# Allegro board T736_DEMO_DBOARD_V2_0.brd
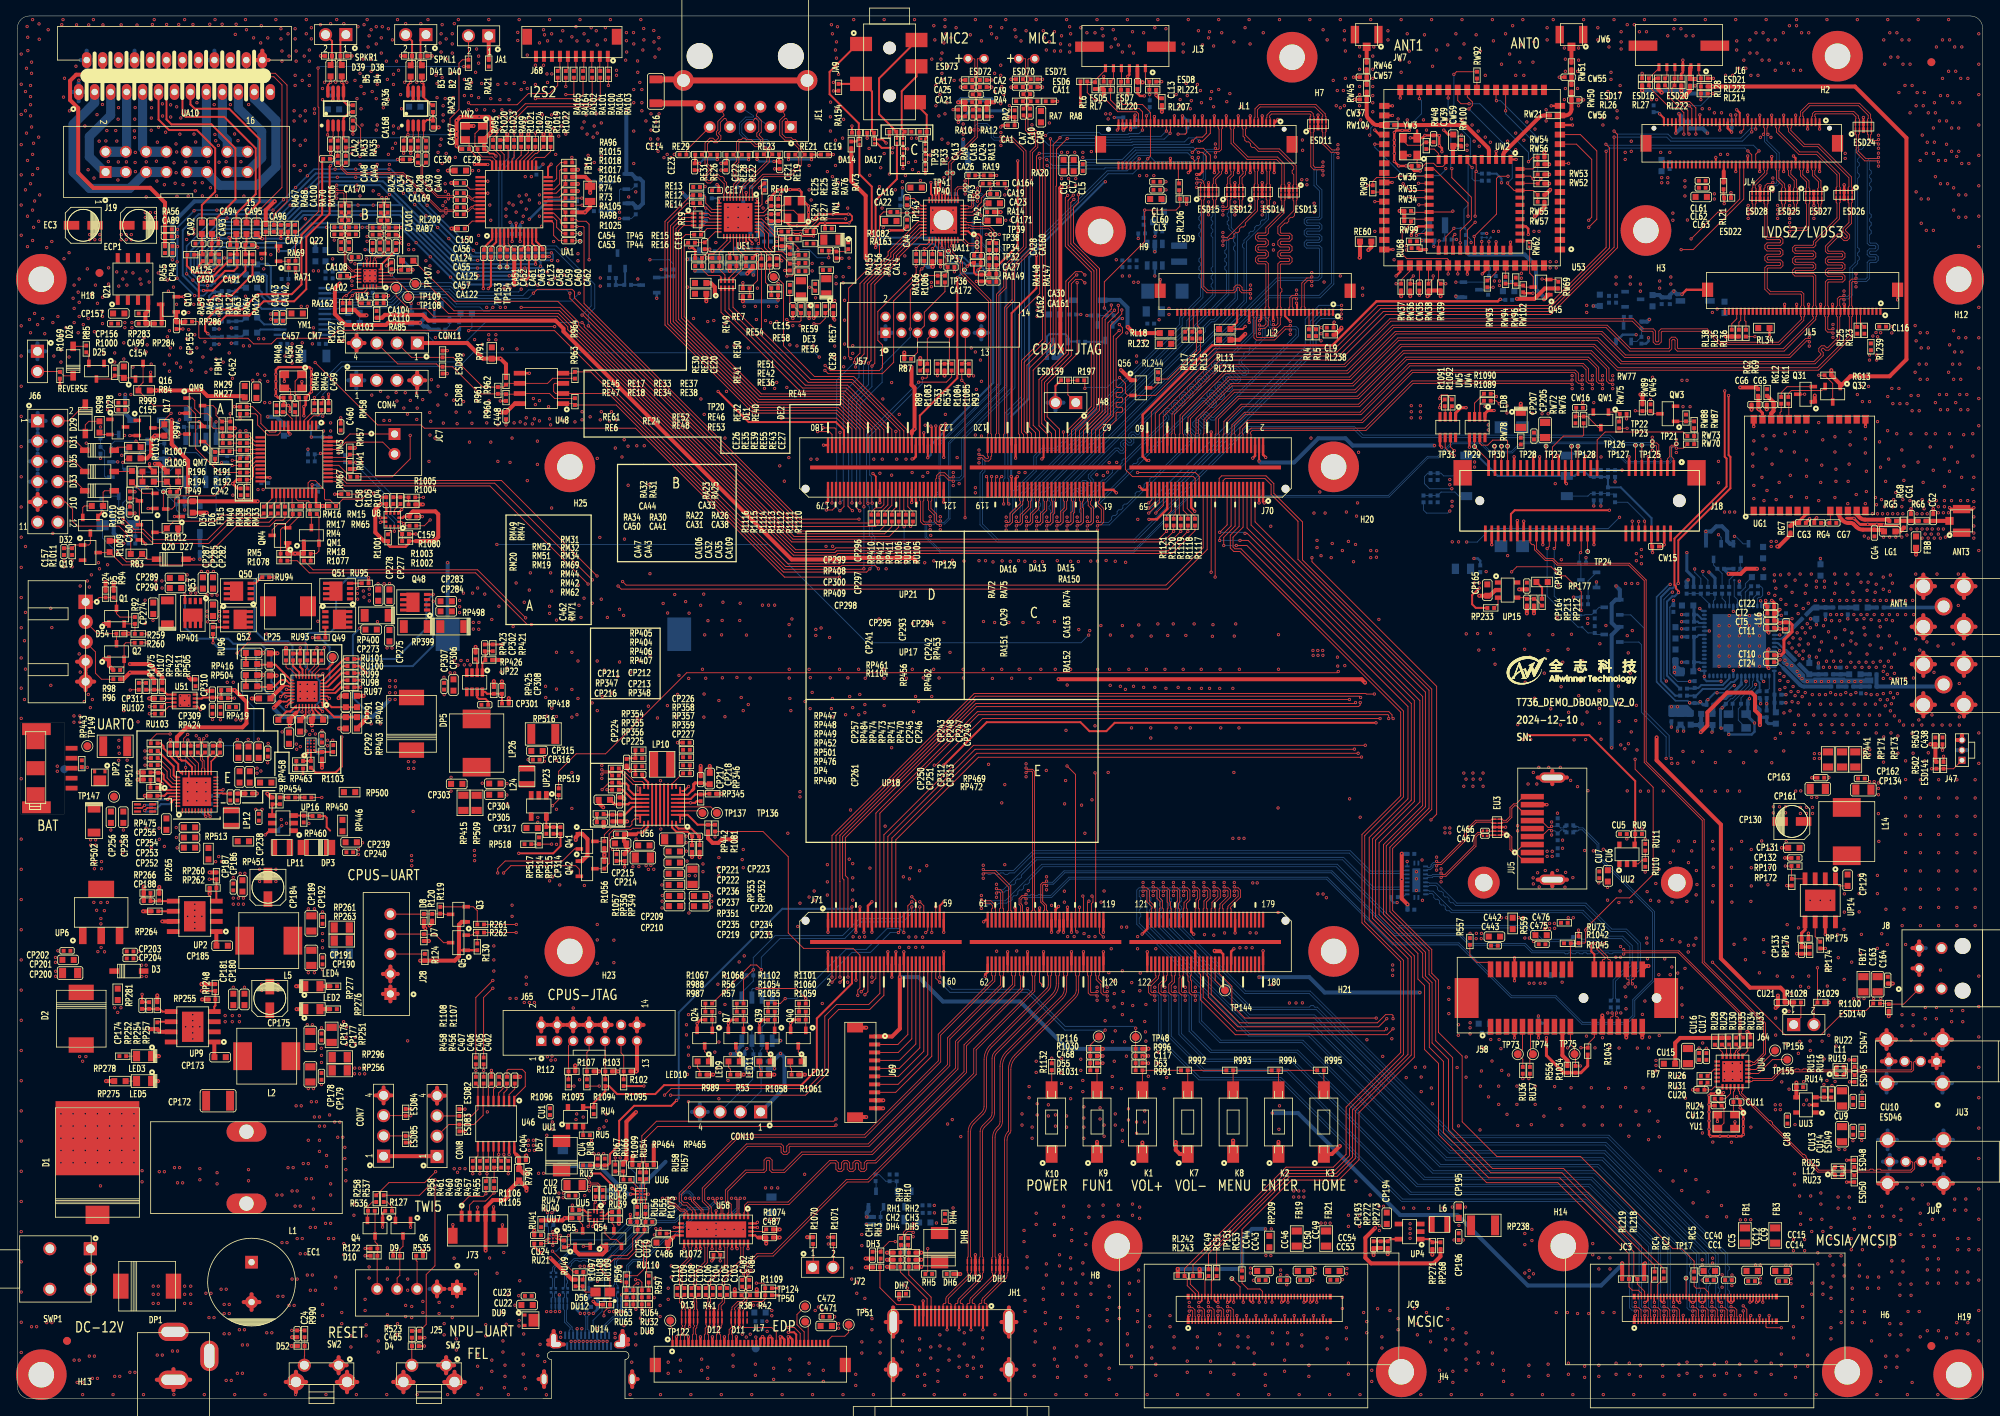
[diagram p0: board, top side]
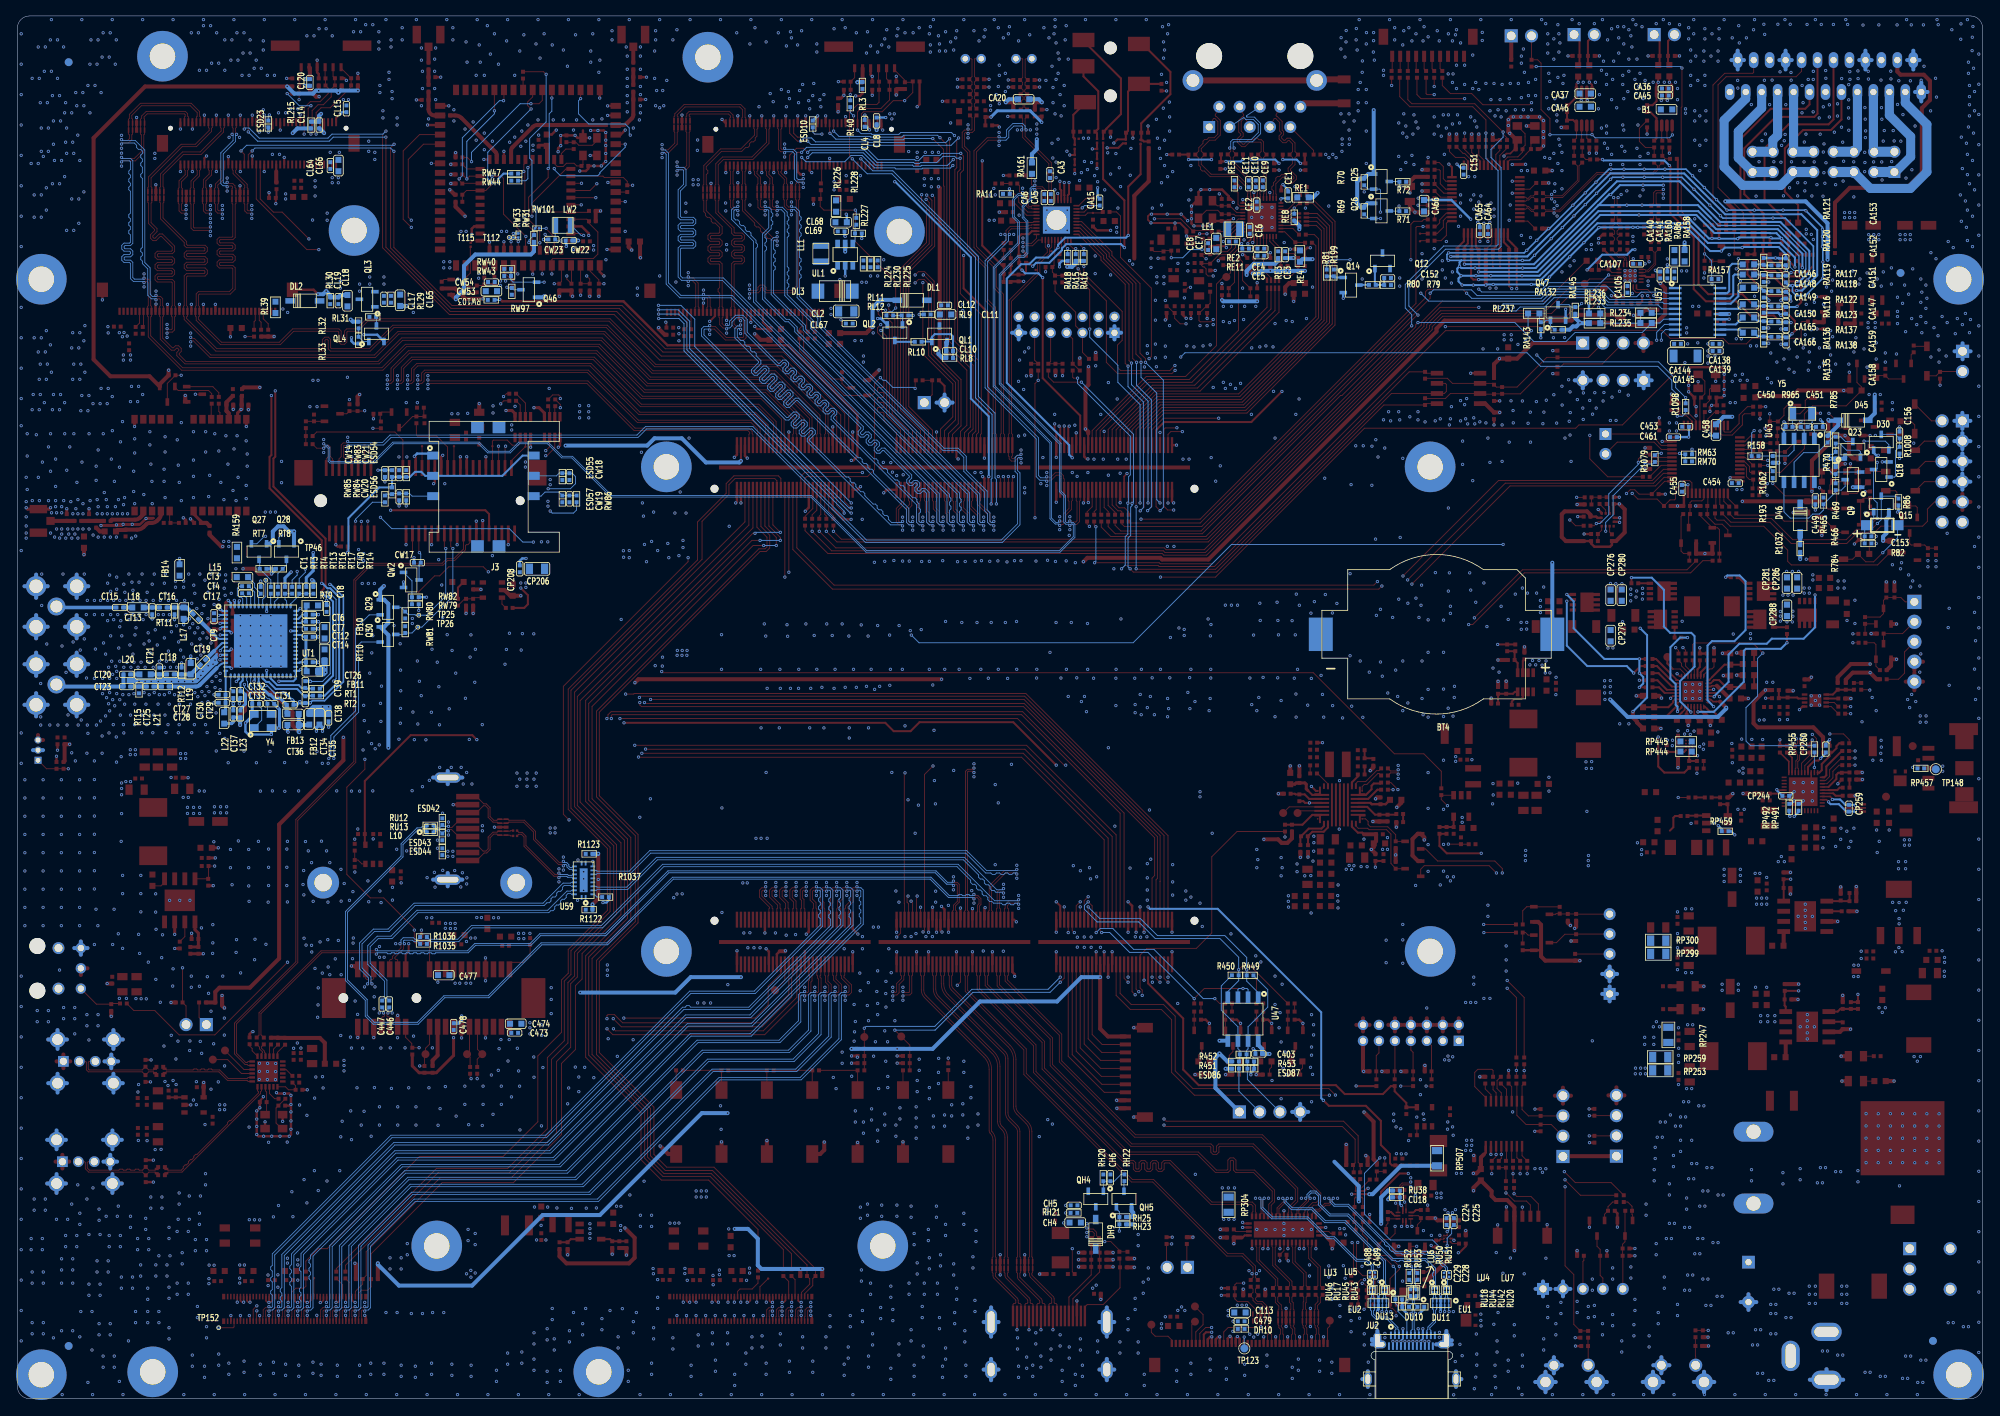
[diagram p1: board, bottom side, seen from below]

Outline 246.2 x 173.3 mm; copper layers: TOP, L2GND, L3, L4, L5GND, BOTTOM. Coordinates in mm from the lower left corner of the outline.
Outline path: 0,171.78 0,1.52 arc(0.45,0.45) 1.52,0 66.88,0 66.88,4.9 arc(66.38,5.4) 66.88,5.9 76.12,5.9 arc(76.62,5.4) 76.12,4.9 76.12,0 244.68,0 arc(245.75,0.45) 246.2,1.52 246.2,171.78 arc(245.75,172.86) 244.68,173.3 1.52,173.3 arc(0.45,172.86) 0,171.78

## Design rules (mm)
net group COMB0-LANE0-N: nets DP-TX0P-1 EDP-TX0P
net group COMB0-LANE0-P: nets DP-TX0N-1 EDP-TX0N
net group COMB0-LANE1-N: nets DP-TX1N-1 EDP-TX1N
net group COMB0-LANE1-P: nets DP-TX1P-1 EDP-TX1P
net group COMB0-LANE2-N: nets DP-TX2P-1 EDP-TX2P
net group COMB0-LANE2-P: nets DP-TX2N-1 EDP-TX2N
net group COMB0-LANE3-N: nets DP-TX3N-1 EDP-TX3N
net group COMB0-LANE3-P: nets DP-TX3P-1 EDP-TX3P
net group DP1: nets MICIN1N-MIC MICIN1P-MIC
net group DP2: nets MICIN2N-MIC MICIN2P-MIC
net group DP3: nets MICIN2N-AC107 MICIN2P-AC107
net group DP-AUXN-1: nets DP-AUXN-1 DP-AUXN-C
net group DP-AUXP-1: nets DP-AUXP-1 DP-AUXP-C
net group HCP: nets HCEC HHPD
net group HS: nets HSCL HSDA
net group HTX0: nets HTX0N HTX0P
net group HTX1: nets HTX1N HTX1P
net group HTX2: nets HTX2N HTX2P
net group HTXC: nets HTXCN HTXCP
net group HUB1: nets HUB-DM1 HUB-DP1
net group HUB-DM3: nets HUB-DM3 N23169507
net group HUB-DM4: nets HUB-DM4 N23169528
net group HUB-DP3: nets HUB-DP3 N23169508
net group HUB-DP4: nets HUB-DP4 N23169529
net group HUB-IN-DM: nets HUB-IN-DM USB1-DM
net group HUB-IN-DP: nets HUB-IN-DP USB1-DP
net group LINEOUT-DSP-L: nets LINEOUT-DSP-LN LINEOUT-DSP-LP
net group LINEOUT-DSP-R: nets LINEOUT-DSP-RN LINEOUT-DSP-RP
net group LINEOUTL: nets LINEOUTLN LINEOUTLP
net group LINEOUTR: nets LINEOUTRN LINEOUTRP
net group LVDS1-D3: nets LVDS1-D3N LVDS1-D3P
net group MCSIA-CK: nets MCSIA-CKN MCSIA-CKP
net group MCSIA-D0: nets MCSIA-D0N MCSIA-D0P
net group MCSIA-D1: nets MCSIA-D1N MCSIA-D1P
net group MCSIA-D2: nets MCSIA-D2N MCSIA-D2P
net group MCSIA-D3: nets MCSIA-D3N MCSIA-D3P
net group MCSIB-CK: nets MCSIB-CKN MCSIB-CKP
net group MCSIB-D0: nets MCSIB-D0N MCSIB-D0P
net group MCSIB-D1: nets MCSIB-D1N MCSIB-D1P
net group MCSIB-D2: nets MCSIB-D2N MCSIB-D2P
net group MCSIB-D3: nets MCSIB-D3N MCSIB-D3P
net group MCSIC-CK: nets MCSIC-CKN MCSIC-CKP
net group MCSIC-D0: nets MCSIC-D0N MCSIC-D0P
net group MCSIC-D1: nets MCSIC-D1N MCSIC-D1P
net group MCSIC-D2: nets MCSIC-D2N MCSIC-D2P
net group MCSIC-D3: nets MCSIC-D3N MCSIC-D3P
net group MDI0: nets MDI0+ MDI0-
net group MDI1: nets MDI1+ MDI1-
net group MDI2: nets MDI2+ MDI2-
net group MDI3: nets MDI3+ MDI3-
net group MICIN1: nets MICIN1N MICIN1P
net group MICIN1-1: nets MICIN1N-AC107 MICIN1P-AC107
net group MICIN2: nets MICIN2N MICIN2P
net group MICIN3: nets MICIN3N MICIN3P
net group MICIN4: nets MICIN4N MICIN4P
net group PCIE21-RD: nets PCIE21-RDN PCIE21-RDP
net group PCIE21-REFCLKN: nets N19487540 PCIE21-REFCLKN
net group PCIE21-REFCLKP: nets N19487538 PCIE21-REFCLKP
net group PCIE21-TDN: nets N21159878 PCIE21-TDN
net group PCIE21-TDP: nets N21159841 PCIE21-TDP
net group RX-1N: nets COMB0-LANE1-N-C RX-1N
net group RX-1P: nets COMB0-LANE1-P-C RX-1P
net group RX-2N: nets COMB0-LANE2-N-C RX-2N
net group RX-2P: nets COMB0-LANE2-P-C RX-2P
net group SPK+-1: nets N19462549 N19462627
net group SPK--1: nets N19462537 N19462788
net group SPKL: nets SPKL+ SPKL-
net group SPKR: nets SPKR+ SPKR-
net group U3-PCIE21-RX: nets U3-PCIE21-RXN U3-PCIE21-RXP
net group U3-PCIE21-TX: nets U3-PCIE21-TXN U3-PCIE21-TXP
net group USB2-DM: nets N17311481 USB2-DM
net group USB2-DP: nets N17311494 USB2-DP
net group USB3-RX: nets USB3-RXN USB3-RXP
net group USB3-TXN-1: nets USB3-TXN USB3-TXN-1
net group USB3-TXP-1: nets USB3-TXP USB3-TXP-1
net group 3V3-STBY: nets EXT-3V3
net group ANT0: nets ANT0 N23955323 N23955325
net group ANT1: nets ANT1 N23955200 N23955219
net group AOUT: nets AOUT1 AOUT2 AOUT3 AOUT3L AOUT3R AOUT4 AOUT5 AOUT6 AOUT_1 AOUT_2 AOUT_3 AOUT_4 AOUT_5 AOUT_6 N23523036 N23523040 N23523124 N23523128
net group COMB0-LANE0-N-C-1: nets COMB0-LANE0-N-C COMB0-LANE0-N-C-1 TX-1N
net group COMB0-LANE0-P-C-1: nets COMB0-LANE0-P-C COMB0-LANE0-P-C-1 TX-1P
net group COMB0-LANE3-N-C-1: nets COMB0-LANE3-N-C COMB0-LANE3-N-C-1 TX-2N
net group COMB0-LANE3-P-C-1: nets COMB0-LANE3-P-C COMB0-LANE3-P-C-1 TX-2P
net group NCSI_D: nets 4G-I2S-BCLK 4G-I2S-DIN 4G-I2S-DOUT 4G-I2S-LRCK I2S2-BCLK I2S2-DOUT0 I2S2-DOUT1 I2S2-LRCK N20492590 N20492593 N20492596 N20492599 N23264918 N23264955 N23264967 N23264991 PCMCLK PCMDI PCMDOUT PCMSYNC
net group POWER-10MIL: nets AXP515-PWROK N22132221 N22132227 N22132299 N22446567 RTCLDO-BMU-ONBOARD
net group PWR: nets PANEL0-12V USB1-DRVVBUS VCC VCC-3V3-GPHY VCC-232-3V3 VCC-485-3V3 VCC-CTP0 VCC-CTP1 VCC-PI VCC-PK VCC-PL VCC-PM VCC-RTC VDRV
net group RGMII_R: nets DVDDRG RGMII0-RXCK RGMII0-RXCTL RGMII0-RXD3 RXC/PHYAD1 RXCTL/PHYAD2 RXD3/PHYAD0
net group RGMII_T: nets RGMII0-TXCK RGMII0-TXCTL RGMII0-TXD0 RGMII0-TXD1 RGMII0-TXD2 RGMII0-TXD3 TXC TXCTL TXD0 TXD1 TXD2 TXD3
net group TYPE-C-D+: nets N21619013 N22132297 TYPE-C-D+ TYPEC-DM TYPEC-DM-1 USB0-DM
net group TYPE-C-D-: nets N21619068 N22132296 TYPE-C-D- TYPEC-DP TYPEC-DP-1 USB0-DP
net group WIFI-5MIL: nets GND_ADC N24228229 N24228241 N24228256 N24228355 N24228385 N24228387 N24228483 N24228516 N24228560 N24228562 N24228564 N24228625 N24228645
nets with their own width: min track width 0.102; nets GND
nets with their own width: min track width 0.114; nets LD2

## Placement (name value [footprint] x y rotation side)
ANT3  GPS-ANT  [ANT3B300_310H125]  243.57 110.02 90 top
ANT4  Antenna_SW4_SMD  [SMA5B700_1500H986]  245.31 99.29 270 top
ANT5  Antenna_SW4_SMD  [SMA5B700_1500H986]  245.31 89.51 270 top
B1  600R-100M  [L0603]  39.6 161.59 0 bottom
B2  600R-100M  [L0603]  50.67 166.42 90 top
B3  600R-100M  [L0603]  49.28 166.42 90 top
B4  600R-100M  [L0603]  40.64 166.44 90 top
B5  600R-100M  [L0603]  39.24 166.44 90 top
BT4  CR2032-8  [CR2B2000_2850H550]  68.41 95.81 180 bottom
C24  1nF  [C0402]  35.05 8.13 270 top
C103  100nF  [C0402]  88.9 13.44 270 top
C104  100nF  [C0402]  87.12 13.44 270 top
C105  100nF  [C0402]  88.01 13.44 270 top
C106  100nF  [C0402]  86.23 13.44 270 top
C107  100nF  [C0402]  85.34 13.44 270 top
C108  100nF  [C0402]  84.45 13.44 270 top
C109  100nF  [C0402]  83.57 13.44 270 top
C110  100nF  [C0402]  82.68 13.44 270 top
C113  4.7uF  [C0603]  93.04 10.8 0 bottom
C117  1nF  [C0402]  140.52 42.95 180 top
C150  10uF  [C0603]  55.5 153.92 180 top
C151  100nF  [C0402]  65.02 153.85 90 bottom
C152  1uF  [C0402]  74.55 140.46 180 bottom
C153  NC-100nF  [C0402]  14.35 108.08 180 bottom
C154  100nF-50V  [C0603]  13.34 128.65 270 top
C155  100nF-50V  [C0402]  13.08 123.95 0 top
C156  NC-100nF-25V  [C0402]  10.41 120.78 270 bottom
C157  NC-100nF-25V  [C0402]  5.84 106.17 90 top
C158  100nF  [C0402]  46.21 112.57 270 top
C159  100nF  [C0402]  49.56 110.55 180 top
C160  NC-100nF-25V  [C0402]  14.1 111.38 90 top
C163  10uF-50V  [C0805]  233.04 51.94 270 top
C164  100nF  [C0402]  234.31 52.45 270 top
C224  100nF  [C0402]  67.16 22.2 270 bottom
C225  100nF  [C0402]  66.24 22.2 270 bottom
C228  100nF  [C0201]  67.49 15.52 270 bottom
C229  100nF  [C0201]  66.83 15.52 270 bottom
C242  NC-1nF-50V  [C0402]  19.56 113.67 0 top
C402  0.1uF  [C0402]  62.31 39.92 90 top
C403  0.1uF  [C0402]  90.68 43.21 0 bottom
C404  0.22uF  [C0402]  63.28 29.89 180 top
C405  0.1uF  [C0402]  61.34 39.92 90 top
C406  0.1uF  [C0402]  60.36 39.92 90 top
C407  0.1uF  [C0402]  59.39 39.92 270 top
C438  100nF  [C0402]  241.17 82.45 90 top
C442  10uF-50V  [C0603]  185.04 57.91 180 top
C443  1uF-50V  [C0402]  185.04 56.77 180 top
C446  100nF  [C0402]  199.61 49.47 270 bottom
C447  100nF  [C0402]  200.5 49.47 270 bottom
C448  NC/224  [C0402]  61.21 123.19 270 top
C449  100nF  [C0402]  20.95 112.52 90 bottom
C450  18pF  [C0402]  24.26 121.79 0 bottom
C451  18pF  [C0402]  20.45 121.79 180 bottom
C452  4.7uF  [C0603]  29.95 126.14 90 top
C453  100nF  [C0402]  37.21 121.82 180 bottom
C454  100nF  [C0402]  30.99 114.76 0 bottom
C455  100nF  [C0402]  37.67 114.1 90 bottom
C456  1uF  [C0402]  33.27 124.08 90 top
C457  20pF  [C0402]  33.78 125.48 0 top
C458  4.7uF  [C0603]  33.4 121.41 90 bottom
C459  100nF  [C0402]  38.99 124.33 270 top
C460  100nF  [C0402]  40.51 121.79 270 top
C461  1uF  [C0402]  38.73 120.52 0 bottom
C462  100nF  [C0402]  27.98 113.67 270 top
C465  1nF  [C0402]  50.39 8.06 270 top
C466  100nF  [C0201]  183.85 71.2 0 top
C467  100nF  [C0201]  183.85 70.54 0 top
C468  1nF  [C0402]  134.83 42.95 180 top
C471  10uF-16V  [C0603]  101.33 9.11 0 top
C472  1uF-16V  [C0402]  101.33 10.27 0 top
C473  1uF  [C0402]  183.9 45.85 180 bottom
C474  10uF-16V  [C0603]  183.77 46.99 180 bottom
C475  100nF  [C0402]  191.01 56.95 180 top
C476  4.7uF  [C0603]  190.88 58.09 180 top
C477  4.7uF  [C0603]  192.79 53.09 180 bottom
C478  100nF  [C0402]  191.54 46.63 90 bottom
C479  100nF  [C0402]  92.89 9.69 180 bottom
C482  100nF  [C0402]  90.81 14.45 270 top
C484  100nF  [C0402]  91.69 14.45 270 top
C486  4.7uF  [C0603]  80.77 19.56 180 top
C487  100nF  [C0402]  94.23 20.19 180 top
C488  100nF  [C0201]  76.78 15.54 270 bottom
C489  100nF  [C0201]  76.12 15.54 270 bottom
CA1  1uF  [C0402]  124.51 159.59 0 top
CA2  33pF  [C0402]  125.54 164.39 180 top
CA3  1uF  [C0402]  116.84 153.42 270 bottom
CA4  100nF  [C0402]  111.46 147.35 270 top
CA5  4.7uF  [C0402]  116.74 150.55 90 bottom
CA6  100nF  [C0402]  117.55 150.55 90 bottom
CA7  100nF  [C0402]  126.04 161.26 90 top
CA8  10uF  [C0603]  128.23 160.68 270 top
CA9  100pF  [C0402]  126.45 163.5 180 top
CA10  100nF  [C0402]  126.87 161.26 90 top
CA11  33pF  [C0402]  127.37 164.39 180 top
CA13  1uF  [C0402]  117.88 161.14 270 top
CA14  2.2uF  [C0402]  115.65 143.03 90 top
CA15  2.2uF  [C0402]  110.62 149.96 90 bottom
CA16  10uF  [C0603]  112.6 151.79 180 top
CA17  33pF  [C0402]  119.2 164.39 180 top
CA18  100nF  [C0402]  119.7 161.14 90 top
CA19  0.47uF  [C0402]  122.3 151 180 top
CA20  10uF  [C0603]  120.14 162.86 180 bottom
CA21  100pF  [C0402]  120.1 163.47 180 top
CA22  2.2uF  [C0402]  111.46 150.01 90 top
CA23  4.7uF  [C0603]  122.38 149.83 180 top
CA24  100nF  [C0402]  120.51 161.14 90 top
CA25  33pF  [C0402]  121 164.39 180 top
CA26  NC  [C0402]  119.58 153.31 180 top
CA27  2.2uF  [C0402]  120.27 143.26 180 top
CA28  100nF/1uF  [C0402]  121.75 144.41 270 top
CA29  100nF  [C0201]  110.95 156.39 270 top
CA30  33pF  [C0402]  122.21 140.98 0 top
CA31  22nF  [C0402]  44.93 145.9 0 top
CA32  470nF  [C0402]  45.44 144.48 270 top
CA33  NC  [C0402]  45.95 147.68 180 top
CA34  0.22uF  [C0402]  49.28 157.25 270 top
CA35  470nF  [C0402]  46.46 144.48 270 top
CA36  1uF  [C0402]  39.75 164.21 180 bottom
CA37  22uF  [C0603]  49.78 163.58 180 bottom
CA38  22nF  [C0402]  46.96 145.9 0 top
CA39  100nF  [C0402]  50.16 155.34 270 top
CA40  100nF  [C0402]  51.18 155.34 270 top
CA41  22nF  [C0402]  41.99 145.92 180 top
CA42  0.22uF  [C0402]  39.24 157.25 270 top
CA43  470nF  [C0402]  41.56 144.53 270 top
CA44  NC  [C0402]  41.06 147.7 0 top
CA45  1uF  [C0402]  39.75 163.32 180 bottom
CA46  22uF  [C0603]  49.78 161.93 180 bottom
CA47  470nF  [C0402]  40.56 144.53 270 top
CA48  100nF  [C0402]  40.13 155.34 270 top
CA49  100nF  [C0402]  41.15 155.34 270 top
CA50  22nF  [C0402]  40.13 145.92 180 top
CA51  2.2uF  [C0402]  58.44 143.56 90 top
CA52  2.2uF  [C0402]  59.33 143.57 90 top
CA53  2.2uF  [C0402]  69.09 145.14 180 top
CA54  2.2uF  [C0402]  69.09 146.02 180 top
CA55  100nF  [C0402]  55.5 150.22 0 top
CA56  2.2uF  [C0402]  55.5 152.37 180 top
CA57  100nF  [C0402]  55.5 148.44 0 top
CA58  1uF  [C0402]  63.14 143.6 270 top
CA59  1uF  [C0402]  64.02 143.6 270 top
CA60  1uF  [C0402]  64.91 143.61 270 top
CA61  2.2uF  [C0402]  60.47 143.58 90 top
CA62  1uF  [C0402]  65.8 143.62 270 top
CA63  2.2uF  [C0402]  61.36 143.58 90 top
CA64  100nF  [C0402]  61.98 146.41 270 bottom
CA65  1uF-16V  [C0402]  62.99 146.41 270 bottom
CA66  10uF-16V  [C0603]  69.98 149.53 90 bottom
CA89  1uF  [C0402]  18.92 145.67 0 top
CA90  1nF  [C0402]  22.73 144.78 0 top
CA91  1nF  [C0402]  24.77 144.78 180 top
CA92  1uF  [C0603]  23.11 146.69 90 top
CA93  1uF  [C0603]  24.38 146.69 90 top
CA94  1uF  [C0603]  27.43 146.69 90 top
CA95  1uF  [C0603]  28.7 146.69 90 top
CA96  4.7uF  [C0603]  29.97 146.69 90 top
CA97  1nF  [C0402]  28.98 144.6 180 top
CA98  1nF  [C0402]  27.08 144.6 0 top
CA99  1uF-50V  [C0402]  15.62 134.75 0 top
CA100  1uF  [C0402]  33.02 146.69 270 top
CA101  100nF  [C0402]  46.86 141.99 90 top
CA102  1uF  [C0402]  40.87 140.74 180 top
CA103  100nF  [C0402]  43.58 137.28 180 top
CA104  100nF  [C0402]  45.47 138.18 0 top
CA105  1uF  [C0402]  44.5 139.04 90 bottom
CA106  1uF  [C0402]  44.5 144.42 90 top
CA107  100nF  [C0402]  43.36 142.24 0 bottom
CA108  1uF  [C0402]  42.31 143.09 180 top
CA109  1uF  [C0402]  47.45 144.42 90 top
CA110  1uF  [C0402]  45.46 137.29 0 top
CA122  1uF  [C0402]  55.63 146.66 180 top
CA123  2.2uF-16V  [C0402]  62.25 143.59 90 top
CA124  100nF  [C0402]  55.5 151.1 0 top
CA125  100nF  [C0402]  55.5 149.33 0 top
CA138  10uF  [C0402]  33.4 132.21 0 bottom
CA139  100nF  [C0402]  33.4 131.32 0 bottom
CA140  100nF  [C0402]  40.39 140.84 90 bottom
CA141  1uF  [C0402]  39.5 140.84 90 bottom
CA142  100nF  [C0402]  33.27 135.51 270 top
CA143  1uF  [C0402]  32.38 135.51 270 top
CA144  100nF  [C0402]  38.23 132.21 180 bottom
CA145  33uF  [C1206]  37.21 130.68 180 bottom
CA146  3.3uF  [C0603]  29.34 142.16 180 bottom
CA147  2.7nF  [C0402]  24.64 136.4 270 bottom
CA148  3.3uF  [C0603]  29.34 140.89 180 bottom
CA149  3.3uF  [C0603]  29.34 139.24 180 bottom
CA150  3.3uF  [C0603]  29.34 137.16 180 bottom
CA151  2.7nF  [C0402]  24.64 138.3 270 bottom
CA152  2.7nF  [C0402]  24.66 140.34 270 bottom
CA153  2.7nF  [C0402]  24.66 142.49 90 bottom
CA158  2.7nF  [C0402]  24.64 132.59 270 bottom
CA159  2.7nF  [C0402]  24.64 134.49 270 bottom
CA160  100nF/1uF  [C0402]  122.64 144.41 270 top
CA161  NC/33pF  [C0402]  122.21 139.97 180 top
CA162  NC/33pF  [C0402]  120.78 140.46 270 top
CA163  100nF  [C0201]  113.74 155.63 270 top
CA164  NC  [C0402]  121.36 152.3 180 top
CA165  3.3uF  [C0603]  29.34 135.51 180 bottom
CA166  3.3uF  [C0603]  29.34 133.6 180 bottom
CA167  NC/100nF  [C0402]  52.07 159.77 270 top
CA168  NC/100nF  [C0402]  42.04 159.77 270 top
CA169  NC/100nF  [C0402]  48.74 155.32 180 top
CA170  NC/100nF  [C0402]  38.73 155.4 180 top
CA171  2.2uF  [C0603]  122.26 147.65 180 top
CA172  100nF  [C0402]  116.97 141.83 0 top
CC1  100nF  [C0402]  212.09 14.86 0 top
CC5  100nF  [C0402]  214.36 14.86 180 top
CC9  100nF  [C0402]  217.25 14.73 180 top
CC12  10uF  [C0603]  217.33 16 180 top
CC14  100nF  [C0402]  221.11 14.73 180 top
CC15  10uF  [C0603]  220.93 16 180 top
CC40  10uF  [C0603]  211.96 16 0 top
CC43  100nF  [C0402]  155.96 14.86 0 top
CC44  10uF  [C0603]  156.04 16 0 top
CC46  100nF  [C0402]  158.62 14.86 180 top
CC49  100nF  [C0402]  161.12 14.86 180 top
CC50  10uF  [C0603]  161.12 16 180 top
CC53  100nF  [C0402]  164.91 14.88 180 top
CC54  10uF  [C0603]  164.93 16 180 top
CE1  100nF  [C0402]  87 150.88 270 bottom
CE2  100nF  [C0402]  90.93 149.61 90 bottom
CE3  100nF  [C0402]  87.38 143.38 90 bottom
CE4  100nF  [C0402]  90.42 144.15 0 bottom
CE5  100nF  [C0402]  90.42 143.26 0 bottom
CE6  NC-100nF  [C0402]  91.82 146.43 270 bottom
CE7  4.7uF  [C0603]  96.01 144.78 90 bottom
CE8  100nF  [C0402]  97.03 144.4 90 bottom
CE9  100nF  [C0402]  90.17 152.27 270 bottom
CE10  100nF  [C0402]  91.06 152.27 270 bottom
CE11  100nF  [C0402]  91.95 152.27 270 bottom
CE14  NC-100nF  [C0402]  83.39 155.93 180 top
CE15  NC-22PF  [C0402]  99.31 146.3 180 top
CE16  1nF-2KV  [C1206]  79.98 163.86 90 top
CE17  100nF  [C0402]  87.45 151.43 180 top
CE18  NC-22PF  [C0402]  86.11 144.5 270 top
CE19  NC-1nF  [C0402]  101.09 155.93 180 top
CE20  NC-22PF  [C0402]  95.12 142.49 270 top
CE21  NC-1nF  [C0402]  95.5 154.56 90 top
CE22  NC-1nF  [C0402]  88.77 154.41 90 top
CE23  NC-1nF  [C0402]  84.84 154.41 90 top
CE24  NC-20pF  [C0402]  94.44 148.03 90 top
CE25  NC-20pF  [C0402]  94.44 149.94 270 top
CE26  NC-100PF  [C0402]  97.16 136.5 90 top
CE27  NC-100PF  [C0402]  102.23 136.5 90 top
CE28  NC-100PF  [C0402]  102.62 143.36 90 top
CE29  20pF  [C0402]  58.07 156.59 180 top
CE30  20pF  [C0402]  56.16 156.62 0 top
CG1  NC  [C0402]  237.22 110.44 270 top
CG2  NC  [C0402]  240.01 110.44 270 top
CG3  100nF  [C0402]  223.63 109.76 180 top
CG4  10nF  [C0402]  232.65 108.49 90 top
CG5  100nF  [C0402]  219.58 124.59 0 top
CG6  100nF  [C0402]  217.68 124.59 0 top
CG7  100nF  [C0402]  227.44 109.76 0 top
CH1  100nF-16V  [C0402]  107.13 17.98 90 top
CH2  NC/pF  [C0402]  110.19 17.41 0 top
CH3  NC/pF  [C0402]  112.1 17.41 180 top
CH4  10uF-50V  [C0603]  113.68 22.07 180 bottom
CH5  100nF  [C0402]  113.82 24.23 180 bottom
CH6  1uF  [C0402]  109.27 27.67 90 bottom
CL1  100nF  [C0402]  142.75 152.53 180 top
CL2  1uF-50V  [C0805]  142.37 136.27 180 bottom
CL3  22uF  [C0603]  142.62 150.37 180 top
CL4  100nF  [C0402]  140.06 159.84 270 bottom
CL5  100nF-50V  [C0402]  133.48 154.31 90 top
CL6  10uF-50V  [C0603]  131.06 154.56 90 top
CL7  22uF-50V  [C0603]  132.33 154.56 90 top
CL8  100nF  [C0402]  138.56 160.15 90 bottom
CL9  100nF  [C0402]  164.47 134.24 180 top
CL10  1uF-50V  [C0402]  129.41 131.32 0 bottom
CL11  10uF-50V  [C0603]  129.92 135.89 0 bottom
CL12  100nF-50V  [C0402]  130.05 137.03 0 bottom
CL13  100nF  [C0402]  140.33 164.56 270 top
CL14  100nF  [C0402]  208.39 159.63 270 bottom
CL15  100nF  [C0402]  204.98 161.67 270 bottom
CL16  100nF  [C0402]  233.68 134.37 180 top
CL17  1uF-50V  [C0402]  200.28 137.79 90 bottom
CL18  10uF-50V  [C0603]  204.85 137.62 270 bottom
CL19  100nF-50V  [C0402]  205.99 137.62 270 bottom
CL20  100nF  [C0402]  209.55 164.97 270 bottom
CL60  1uF  [C0402]  142.75 151.51 180 top
CL61  100nF  [C0402]  211.07 152.65 180 top
CL62  1uF  [C0402]  211.07 151.76 180 top
CL63  22uF  [C0603]  210.95 150.62 180 top
CL64  100nF-50V  [C0402]  206.99 154.55 90 bottom
CL65  10uF-50V  [C0603]  198.25 137.67 270 bottom
CL66  22uF-50V  [C0603]  205.98 154.55 90 bottom
CL67  100nF-50V  [C0402]  141.99 134.75 180 bottom
CL68  10uF  [C0603]  143 147.45 0 bottom
CL69  1nF  [C0402]  143 146.3 0 bottom
CM7  20pF  [C0402]  35.69 125.48 180 top
CON4  NC/CON1X4-2.54-F-DIP  [SKT1_4P254B250_1036H850]  46.28 127.64 0 top
CON7  CON_4P_2R54_PH  [HDR1_4P254B250_1016H254]  45.88 34.2 90 top
CON8  CON_4P_2R54_PH  [HDR1_4P254B250_1016H254]  52.58 34.16 90 top
CON10  CON_4P_2R54_PH  [HDR1_4P254B250_1016H254]  89.3 35.94 180 top
CON11  CON_4P_2R54_PH  [HDR1_4P254B250_1016H254]  46.3 132.31 180 top
CP48  100nF-50V  [C0402]  19.43 144.02 270 top
CP129  100nF-16V  [C0603]  229.28 64.98 270 top
CP130  22uF-50V  [CA430H540]  222.3 72.34 180 top
CP131  10uF-50V  [C0603]  222.55 69.04 0 top
CP132  4.7uF-50V  [C0402]  222.68 67.77 0 top
CP133  NC  [C0402]  223.52 56.19 270 top
CP134  47uF-16V  [C0805]  231.26 76.33 0 top
CP155  1uF  [C0402]  19.94 134.49 270 top
CP156  100nF-50V  [C0402]  12.19 134.75 0 top
CP157  10uF-50V  [C0603]  12.7 136.02 0 top
CP161  47uF-16V  [C0805]  225.55 76.43 180 top
CP162  100nF-16V  [C0402]  231.01 77.73 180 top
CP163  1uF-16V  [C0402]  225.93 77.83 0 top
CP164  NC-22nF  [C0402]  189.1 99.82 90 top
CP165  2.2uF-16V  [C0603]  184.15 101.35 90 top
CP166  2.2uF  [C0402]  189.1 101.85 90 top
CP172  100uF-50V  [C1210]  25.15 37.34 180 top
CP173  100nF-16V  [C0603]  25.4 42.8 0 top
CP174  47pF  [C0402]  15.62 49.28 90 top
CP175  22uF-50V  [CA430H540]  31.62 50.16 90 top
CP176  47uF-16V  [C0805]  36.7 45.09 90 top
CP177  100nF-16V  [C0402]  38.1 45.34 270 top
CP178  47uF-16V  [C0805]  36.7 40.64 270 top
CP179  1uF-16V  [C0402]  38.1 40.39 90 top
CP180  10uF-50V  [C0603]  28.45 50.04 270 top
CP181  100nF-50V  [C0603]  27.05 50.04 270 top
CP184  22uF-50V  [CA430H540]  31.39 64.09 90 top
CP185  100nF-16V  [C0603]  25.65 56.77 180 top
CP186  10uF-50V  [C0603]  28.19 64.26 270 top
CP187  4.7uF-50V  [C0402]  27.05 64.14 270 top
CP188  NC  [C0402]  16.26 62.36 180 top
CP189  47uF-16V  [C0805]  36.83 59.56 90 top
CP190  47uF-16V  [C0805]  36.83 55.24 270 top
CP191  1uF-16V  [C0402]  38.23 54.86 90 top
CP192  100nF-16V  [C0402]  38.23 59.94 270 top
CP193  20pF  [C0402]  169.9 19.3 270 top
CP194  4.7uF  [C0603]  171.55 22.61 90 top
CP195  10uF  [C0603]  180.57 23.37 90 top
CP196  100nF  [C0402]  180.57 20.31 270 top
CP200  22uF-50V  [C0805]  6.6 53.34 0 top
CP201  10uF-50V  [C0603]  6.35 54.99 0 top
CP202  100nF  [C0402]  6.22 56.13 0 top
CP203  2.2uF  [C0402]  14.12 56.06 180 top
CP204  100nF  [C0402]  14.12 55.17 180 top
CP205  47uF-16V  [C0805]  191.39 121.41 90 top
CP206  47uF-16V  [C0805]  181.1 104.01 180 bottom
CP207  100nF-16V  [C0402]  189.99 120.65 270 top
CP208  1uF-16V  [C0402]  183.26 104.01 270 bottom
CP209  10uF-50V  [C0603]  78.49 69.34 0 top
CP210  22uF-50V  [C0805]  78.36 67.82 0 top
CP211  10uF  [C0603]  73.53 75.06 180 top
CP212  100nF  [C0402]  75.44 74.93 90 top
CP213  100nF-50V  [C0402]  75.56 72.77 270 top
CP214  10uF  [C0603]  75.56 69.6 180 top
CP215  100nF  [C0402]  75.56 70.74 180 top
CP216  470nF-50V  [C0402]  73.03 72.26 0 top
CP217  100nF  [C0402]  85.6 77.6 90 top
CP218  10uF  [C0603]  86.74 77.72 90 top
CP219  10uF-50V  [C0603]  82.32 61.73 0 top
CP220  100uF-50V  [C0805]  84.58 65.41 270 top
CP221  33uF-50V  [C0805]  82.04 70.1 180 top
CP222  4.7uF-50V  [C0603]  82.3 68.58 180 top
CP223  220nF-25V  [C0402]  84.96 70.48 0 top
CP224  NC/1nF  [C0402]  76.33 79.76 270 top
CP225  100nF-50V  [C0402]  77.85 78.23 0 top
CP226  3.3nF  [C0402]  83.79 82.22 180 top
CP227  100nF-50V  [C0402]  83.82 78.36 180 top
CP233  4.7uF-50V  [C0603]  85.47 61.72 180 top
CP234  4.7uF-50V  [C0603]  85.47 62.99 180 top
CP235  100nF-50V  [C0603]  82.32 63 0 top
CP236  100nF-50V  [C0603]  82.3 67.18 180 top
CP237  100nF-50V  [C0603]  82.3 65.79 180 top
CP238  4.7uF  [C0402]  30.25 72.87 90 top
CP239  10uF  [C0603]  41.82 69.74 180 top
CP240  100nF  [C0402]  41.64 68.48 180 top
CP241  10uF  [C0603]  34.02 82.78 90 top
CP242  100nF  [C0402]  38.16 82.66 90 top
CP243  NC/10uF-15V  [C0603]  27.69 81.03 270 top
CP244  4.7uF  [C0402]  24.66 75.55 0 bottom
CP245  1uF  [C0402]  24.51 81.41 90 top
CP246  1uF  [C0402]  25.4 81.41 90 top
CP247  NC/10uF-15V  [C0603]  30.23 81.03 270 top
CP248  10uF-15V  [C0603]  28.96 81.03 270 top
CP249  1uF-15V  [C0402]  31.37 80.9 270 top
CP250  47nF-25V  [C0402]  26.67 75.41 90 top
CP251  NC/100pF  [C0402]  27.56 75.41 270 top
CP252  22uF  [C0603]  21.56 69.06 0 top
CP253  NC/22uF  [C0603]  21.56 70.33 0 top
CP254  NC/22uF  [C0603]  21.56 71.6 0 top
CP255  10uF  [C0603]  18.67 72.01 270 top
CP256  10uF  [C0603]  11.72 72.87 270 top
CP257  100nF  [C0402]  19.16 81.41 270 top
CP258  10uF  [C0603]  13.27 72.87 90 top
CP259  1uF  [C0402]  16.74 74 270 bottom
CP260  1uF  [C0402]  19.65 81.42 270 bottom
CP261  4.7uF  [C0402]  17.65 78.02 90 top
CP273  100nF/50V  [C0603]  44.32 96.39 180 top
CP274  100nF/50V  [C0603]  17.02 99.06 90 top
CP275  22uF/25V  [C0603]  46.61 95.63 270 top
CP276  22uF/25V  [C0603]  46.61 100.71 90 bottom
CP277  22uF/25V  [C0603]  46.61 100.71 90 top
CP278  22uF/25V  [C0603]  45.21 100.71 90 top
CP279  NC/22uF/25V  [C0603]  46.61 95.63 270 bottom
CP280  NC/22uF/25V  [C0603]  45.21 100.71 90 bottom
CP281  22uF/25V  [C0603]  24.51 102.23 90 bottom
CP282  22uF/25V  [C0603]  24.51 98.81 270 top
CP283  10uF/25V  [C0603]  53.72 99.95 0 top
CP284  NC/22uF/25V  [C0603]  53.72 98.68 0 top
CP285  22uF/25V  [C0603]  24.51 102.23 90 top
CP286  22uF/25V  [C0603]  23.24 102.23 90 bottom
CP287  NC/22uF/25V  [C0603]  23.24 102.23 90 top
CP288  NC/22uF/25V  [C0603]  24.51 98.81 270 bottom
CP289  22uF/25V  [C0603]  19.81 102.87 0 top
CP290  22uF/25V  [C0603]  19.81 101.6 0 top
CP291  33nF/50V  [C0603]  41.15 87.38 90 top
CP292  33nF/50V  [C0603]  41.15 84.71 270 top
CP293  10uF/16V  [C0603]  35.43 84.33 90 top
CP294  100nF/50V  [C0603]  37.59 85.09 0 top
CP295  100nF/50V  [C0603]  33.4 85.09 180 top
CP296  8pF/50V  [C0603]  31.62 92.71 90 top
CP297  16pF/50V  [C0603]  31.62 89.92 90 top
CP298  10uF/16V  [C0603]  30.99 87.76 180 top
CP299  4.7nF/50V  [C0603]  29.34 93.47 0 top
CP300  4.7nF/50V  [C0603]  29.34 90.68 0 top
CP301  10nF  [C0402]  58.56 86.97 180 top
CP302  100pF  [C0402]  58.55 94.11 270 top
CP303  22uF  [C0603]  55.04 77.05 180 top
CP304  100nF  [C0603]  59.82 77.09 0 top
CP305  NC/22uF  [C0603]  59.82 75.69 0 top
CP306  10uF  [C0603]  54.64 89.45 90 top
CP307  100nF  [C0402]  53.45 89.29 90 top
CP308  100nF  [C0402]  60.71 88.77 90 top
CP309  10uF  [C0402]  24.43 86.27 90 top
CP310  1uF  [C0402]  24.43 88.3 270 top
CP311  100nF  [C0402]  17.65 87.76 180 top
CP312  22uF  [C0603]  27.84 77.93 90 top
CP313  22uF  [C0603]  29.11 77.93 90 top
CP314  20pF  [C0402]  68.05 71.22 270 top
CP315  10uF  [C0603]  65.1 81.18 0 top
CP316  100nF  [C0402]  65 80.09 0 top
CP317  4.7uF  [C0603]  64.49 71.53 0 top
CT1  100nF  [C0402]  215.72 101.32 90 bottom
CT2  100nF  [C0402]  219.66 98.4 180 top
CT3  220nF  [C0402]  217.63 101.83 180 bottom
CT4  220nF  [C0402]  217.63 100.94 180 bottom
CT5  100nF-50V  [C0402]  219.66 97.51 180 top
CT6  100nF  [C0402]  209.62 98.27 0 bottom
CT7  1uF  [C0402]  209.62 97.38 0 bottom
CT8  1uF  [C0402]  207.47 99.03 270 bottom
CT9  10nF  [C0402]  221.56 98.02 270 bottom
CT10  100nF-50V  [C0402]  219.66 93.19 0 top
CT11  22nF  [C0402]  219.66 96.62 180 top
CT12  100nF  [C0402]  209.62 96.49 180 bottom
CT13  18pF  [C0402]  229.31 98.74 90 bottom
CT14  100nF  [C0402]  209.62 95.48 0 bottom
CT15  18pF  [C0402]  233.37 99.16 180 bottom
CT16  100nF  [C0402]  227.91 99.16 0 bottom
CT17  10nF  [C0402]  223.85 98.02 45 bottom
CT18  100nF  [C0402]  227.02 90.78 0 bottom
CT19  10nF  [C0402]  222.96 92.3 315 bottom
CT20  18pF  [C0402]  232.48 90.78 180 bottom
CT21  18pF  [C0402]  228.42 91.2 270 bottom
CT22  22nF  [C0402]  219.66 99.29 0 top
CT23  330pF  [C0402]  232.48 89.26 180 bottom
CT24  1uF  [C0402]  219.66 92.3 0 top
CT25  100nF  [C0402]  229.56 89.26 180 bottom
CT26  100nF  [C0402]  209.62 92.3 180 bottom
CT27  1uF  [C0402]  220.55 88.24 180 bottom
CT28  100nF  [C0402]  220.55 87.22 180 bottom
CT29  100nF  [C0402]  218.26 88.24 90 bottom
CT30  1uF  [C0402]  219.15 88.24 90 bottom
CT31  100nF  [C0402]  212.04 86.97 0 bottom
CT32  18pF  [C0402]  216.36 87.1 0 bottom
CT33  18pF  [C0402]  214.45 87.1 180 bottom
CT34  4.7uF  [C0603]  208.35 85.19 270 bottom
CT35  100nF  [C0402]  207.21 85.32 270 bottom
CT36  4.7uF  [C0603]  211.66 84.43 0 bottom
CT37  100nF  [C0402]  219.15 85.83 90 bottom
CT38  4.7nF  [C0402]  210.13 87.6 270 bottom
CT39  4.7nF  [C0402]  210.13 89.51 90 bottom
CT40  1uF  [C0402]  210.01 101.32 270 bottom
CU1  1uF  [C0402]  66.73 35.97 90 top
CU2  22uF  [C0805]  69.8 26.77 180 top
CU3  100nF  [C0402]  69.49 25.45 180 top
CU4  100nF  [C0402]  72.69 29.67 270 top
CU5  1uF  [C0402]  201.19 70.76 180 top
CU6  10uF  [C0603]  199.25 65.52 90 top
CU7  100nF  [C0402]  198.17 65.66 90 top
CU8  1uF  [C0402]  221.74 34.9 90 top
CU9  22uF  [C0805]  228.59 37.63 270 top
CU10  100nF  [C0402]  229.98 37.25 270 top
CU11  18pF-C0G  [C0402]  215.4 37.17 0 top
CU12  18pF-C0G  [C0402]  213.08 36.73 180 top
CU13  22uF  [C0805]  228.59 33.15 90 top
CU14  100nF  [C0402]  229.98 33.5 90 top
CU15  22uF  [C0805]  209.28 42.94 270 top
CU16  4.7uF  [C0402]  210.69 42.9 270 top
CU17  100nF  [C0402]  211.6 42.89 270 top
CU18  100nF  [C0402]  73.43 25.22 180 bottom
CU19  330pF  [C0402]  79.12 22.15 180 top
CU20  10nF  [C0402]  210.92 38.71 0 top
CU21  100nF  [C0402]  220.98 49.66 0 top
CU22  10uF-16V  [C0603]  63.86 11.73 180 top
CU23  1uF  [C0402]  64.01 12.88 180 top
CU24  100nF  [C0402]  65.18 20.47 0 top
CU25  330pF  [C0402]  77.22 22.15 0 top
CW14  33pF  [C0402]  200.15 115.95 90 bottom
CW15  100nF  [C0402]  205.23 106.81 0 top
CW16  100nF  [C0402]  195.71 124.21 180 top
CW17  100nF  [C0402]  196.09 104.78 180 bottom
CW18  33pF  [C0402]  177.04 115.57 90 bottom
CW19  33pF  [C0402]  177.04 112.78 90 bottom
CW20  33pF  [C0402]  198.37 113.03 90 bottom
CW21  220nF  [C0402]  198.37 115.95 270 bottom
CW22  4.7uF  [C0402]  177.09 145.16 180 bottom
CW23  NC/4.7uF  [C0402]  179.25 145.29 180 bottom
CW35  NC  [C0402]  175.64 139.32 90 top
CW36  18pF  [C0402]  175.11 154.51 180 top
CW37  NC  [C0402]  168.61 162.84 0 top
CW39  18pF  [C0402]  177.42 157.91 90 top
CW45  100nF  [C0402]  204.6 124.21 270 top
CW53  10uF  [C0603]  186.82 138.81 180 bottom
CW54  100nF  [C0402]  186.82 139.95 0 bottom
CW55  NC  [C0402]  194.27 165.63 0 top
CW56  NC  [C0402]  195.12 162.78 180 top
CW57  NC  [C0402]  168.61 165.63 0 top
CW59  10uF  [C0603]  179.88 157.73 90 top
D1  SM8J22A  [SOD1000_1350H485]  10.03 29.59 270 top
D2  SS34  [SOD591_686H234]  8 47.62 90 top
D3  MM1Z3V6  [SOD155_270H118]  13.97 53.59 180 top
D4  ESD5451X-2-TR  [ESD0402]  49.86 6.59 180 top
D5  ESD5451X-2-TR  [ESD0402]  11.05 100.84 270 top
D7  ESD5451X-2-TR  [ESD0402]  50.93 57.78 90 top
D8  ESD5451X-2-TR  [ESD0402]  50.93 60.33 90 top
D9  ESD5451X-2-TR  [ESD0402]  47.49 17.91 0 top
D10  ESD5451X-2-TR  [ESD0402]  44.68 17.91 0 top
D11  AZ1345-04F  [RCLAMP0524P]  89.42 10.61 0 top
D12  AZ1345-04F  [RCLAMP0524P]  88.27 9.75 180 top
D13  AZ1345-04F  [RCLAMP0524P]  85.22 9.75 180 top
D24  NC-1N5819HW  [SOD123]  10.07 109.67 0 bottom
D25  BAT54C  [SOT3P95B130_290H103]  9.91 128.78 270 top
D26  MM3Z5V1  [SOD155_270H118]  6.99 130.05 270 top
D27  NC-MM3Z5V1  [SOD155_270H118]  19.29 105.22 180 top
D28  BAT54C  [SOT3P95B130_290H103]  12.57 121.79 0 top
D29  MM3Z5V1  [SOD155_270H118]  8.51 122.81 90 top
D30  NC-BAT54C  [SOT3P95B130_290H103]  12.7 119.89 90 bottom
D31  NC-MM3Z5V1  [SOD155_270H118]  10.29 118.87 180 top
D32  NC-BAT54C  [SOT3P95B130_290H103]  9.14 109.48 270 top
D33  NC-MM3Z5V1  [SOD155_270H118]  10.29 113.79 180 top
D34  NC-BAT54C  [SOT3P95B130_290H103]  16.26 112.52 180 top
D35  NC-MM3Z5V1  [SOD155_270H118]  10.29 116.2 180 top
D36  NC-BAV99  [SOT3P95B130_290H103]  19.56 111.51 180 top
D38  ESD5451X-2-TR  [ESD0402]  40.89 168.3 180 top
D39  ESD5451X-2-TR  [ESD0402]  38.99 168.3 0 top
D40  ESD5451X-2-TR  [ESD0402]  50.93 168.3 180 top
D41  ESD5451X-2-TR  [ESD0402]  49.02 168.3 0 top
D45  XBS104S14  [SOD155_270H118]  16.23 122.63 0 bottom
D46  XBS104S14  [SOD155_270H118]  22.86 110.24 90 bottom
D52  ESD5451X-2-TR  [ESD0402]  35.56 6.6 0 top
D53  ESD5451X-2-TR  [ESD0402]  140.52 42.05 180 top
D54  ESD5451X-2-TR  [ESD0402]  12.83 95.89 180 top
D55  ESD5451X-2-TR  [ESD0402]  134.83 42.05 180 top
D56  IN5819  [SOD323]  73.33 13.36 180 top
D57  SS24  [SOD362_432H229]  68.17 30.45 270 top
DA13  ESD5451X-2/TR  [ESD0402]  111.58 158.8 180 top
DA14  ESD5451X-2/TR  [ESD0402]  104.98 158.67 0 top
DA15  ESD5451X-2/TR  [ESD0402]  113.49 158.8 0 top
DA16  ESD5451X-2/TR  [ESD0402]  109.68 158.8 0 top
DA17  ESD5451X-2/TR  [ESD0402]  106.88 158.67 0 top
DE1  LED-0805-R  [LED0805]  98.17 139.17 270 top
DE2  LED-0805-R  [LED0805]  101.35 139.42 270 top
DE3  LED-0805-R  [LED0805]  101.98 145.26 0 top
DH1  AZ1345-04F  [RCLAMP0524P]  124.08 16.31 180 top
DH2  AZ1345-04F  [RCLAMP0524P]  121.01 16.31 180 top
DH3  ESD9B5VL-2-TR  [ESD0402]  107.64 16.46 0 top
DH4  ESD9B5VL-2-TR  [ESD0402]  110.19 16.52 0 top
DH5  ESD9B5VL-2-TR  [ESD0402]  112.1 16.52 180 top
DH6  ESD9B5VL-2-TR  [ESD0402]  116.84 15.62 180 top
DH7  ESD5451X-2/TR  [ESD0402]  110.9 13.14 0 top
DH8  SS24  [SOD362_432H229]  115.53 18.92 270 top
DH9  XBS104S14  [SOD155_270H118]  111.11 20.6 270 bottom
DH10  ESD5451X-2/TR  [ESD0402]  92.89 8.74 180 bottom
DL1  XBS104S14  [SOD155_270H118]  134.11 137.67 0 bottom
DL2  XBS104S14  [SOD155_270H118]  210.19 137.59 0 bottom
DL3  NC-SS16F  [SOD250_380H100]  143.76 138.81 180 bottom
DP1  S6M  [SOD591_686H234]  16.26 14.1 180 top
DP2  PTVSHC3N4V5B  [DFN3P130B200_200H65]  10.33 77.86 0 top
DP3  DSK24  [SOD180_270H110]  37.47 69.09 0 top
DP4  LED-0402-G/NC  [LED0402]  17.11 76.58 0 top
DP5  S6M  [SOD591_686H234]  49.38 84.58 270 top
DU8  PT2C051N  [ESD0402]  78.66 11.81 180 top
DU9  PTVSHC3N18VU  [DFN3P130B200_200H65]  64.29 9.83 90 top
DU10  PT2C051N  [ESD0402]  72.29 11.51 180 bottom
DU11  PT2C051N  [ESD0402]  70.38 11.51 0 bottom
DU12  PT2C051N  [ESD0402]  73.81 11.79 0 top
DU13  PT2C051N  [ESD0402]  73.15 12.45 0 bottom
DU14  PT2C051N  [ESD0402]  76.73 11.81 0 top
EC1  3300uF-50V  [CA1000H1250_THR]  29.34 14.61 270 top
EC3  10uF-25V  [CA430H540]  8.26 147.07 0 top
ECP1  22uF-50V  [CA430H540]  15.19 147.07 0 top
ESD5  ESD9B5VL-2/TR  [ESD0402]  136.52 165.07 0 top
ESD6  ESD9B5VL-2/TR  [ESD0402]  133.6 165.1 0 top
ESD7  ESD5451X-2/TR  [ESD0402]  138.68 165.07 180 top
ESD8  ESD5451X-2/TR  [ESD0402]  142.24 165.07 180 top
ESD9  ESD5451X-2/TR  [ESD0402]  146.05 150.37 180 top
ESD10  ESD5451X-2/TR  [ESD0402]  146.56 159.77 270 bottom
ESD11  RCLAMP3324P  [RA9P50B100_250H58]  162.94 159.74 90 top
ESD12  RCLAMP3324P  [RA9P50B100_250H58]  152.52 151.24 90 top
ESD13  RCLAMP3324P  [RA9P50B100_250H58]  159.3 151.17 270 top
ESD14  RCLAMP3324P  [RA9P50B100_250H58]  155.95 151.24 90 top
ESD15  RCLAMP3324P  [RA9P50B100_250H58]  149.22 151.26 90 top
ESD16  ESD9B5VL-2/TR  [ESD0402]  206 165.5 0 top
ESD17  ESD9B5VL-2/TR  [ESD0402]  203.97 165.5 0 top
ESD20  ESD5451X-2/TR  [ESD0402]  208.03 165.48 180 top
ESD21  ESD5451X-2/TR  [ESD0402]  211.33 165.48 180 top
ESD22  ESD5451X-2/TR  [ESD0402]  214.25 150.5 180 top
ESD23  ESD5451X-2/TR  [ESD0402]  214.76 159.77 90 bottom
ESD24  RCLAMP3324P  [RA9P50B100_250H58]  231.27 159.44 90 top
ESD25  RCLAMP3324P  [RA9P50B100_250H58]  222 150.75 270 top
ESD26  RCLAMP3324P  [RA9P50B100_250H58]  228.85 150.88 270 top
ESD27  RCLAMP3324P  [RA9P50B100_250H58]  225.04 150.75 270 top
ESD28  RCLAMP3324P  [RA9P50B100_250H58]  218.31 150.75 270 top
ESD42  ESD9N5BU  [ESD0402]  192.96 72.32 270 bottom
ESD43  ESD9N5BU  [ESD0402]  192.96 70.41 90 bottom
ESD44  ESD5451X-2/TR  [ESD0402]  192.96 68.55 270 bottom
ESD45  ESD9N5BU  [ESD0402]  230.15 40.13 90 top
ESD46  ESD5451X-2/TR  [ESD0402]  231.13 37.25 270 top
ESD47  ESD9N5BU  [ESD0402]  230.15 42.03 270 top
ESD48  ESD9N5BU  [ESD0402]  230.12 29.47 270 top
ESD49  ESD5451X-2/TR  [ESD0402]  231.1 33.5 90 top
ESD50  ESD9N5BU  [ESD0402]  230.12 27.56 90 top
ESD54  ESD5451X-2/TR  [ESD0402]  197.49 115.95 90 bottom
ESD55  ESD5451X-2/TR  [ESD0402]  177.93 115.57 270 bottom
ESD56  ESD5451X-2/TR  [ESD0402]  197.49 113.03 270 bottom
ESD57  ESD5451X-2/TR  [ESD0402]  177.93 112.78 270 bottom
ESD70  ESD5451X-2-TR  [ESD0402]  125.54 165.37 0 top
ESD71  ESD5451X-2-TR  [ESD0402]  127.37 165.37 180 top
ESD72  ESD5451X-2-TR  [ESD0402]  121 165.28 180 top
ESD73  ESD5451X-2-TR  [ESD0402]  119.2 165.28 0 top
ESD82  ESD5451X-2-TR  [ESD0402]  55.37 35.86 270 top
ESD83  ESD5451X-2-TR  [ESD0402]  55.37 33.93 90 top
ESD84  ESD5451X-2-TR  [ESD0402]  48.64 35.89 270 top
ESD85  ESD5451X-2-TR  [ESD0402]  48.64 32.51 90 top
ESD86  ESD5451X-2-TR  [ESD0402]  93.59 41.35 180 bottom
ESD87  ESD5451X-2-TR  [ESD0402]  91.69 41.35 0 bottom
ESD88  ESD5451X-2-TR  [ESD0402]  53.26 128.91 90 top
ESD89  ESD5451X-2-TR  [ESD0402]  53.26 130.94 270 top
ESD139  ESD5451X-2/TR  [ESD0402]  131.18 127.64 0 top
ESD140  ESD5451X-2-TR  [ESD0402]  234.44 49.02 90 top
ESD141  ESD5451X-2/TR  [ESD0402]  241.3 79.38 270 top
EU1  ESD73034D  [ESD10P50B100_250H55]  67.89 11.96 0 bottom
EU2  ESD73034D  [ESD10P50B100_250H55]  75.69 11.96 0 bottom
EU3  ESD73034D  [ESD10P50B100_250H55]  185.37 71.63 90 top
FB1  90@100M  [R0805]  216.41 20.45 90 top
FB3  90@100M  [R0805]  220.22 20.45 90 top
FB7  600R@100M-1A  [L0603]  206.97 41.97 0 top
FB8  600R@100M-1A  [L0603]  237.86 107.35 270 top
FB10  120R@100M-1A  [L0603]  207.72 95.99 270 bottom
FB11  120R@100M-1A  [L0603]  209.24 91.16 180 bottom
FB12  120R@100M-1A  [L0603]  209.62 85.19 270 bottom
FB13  120R@100M-1A  [L0603]  211.66 85.83 0 bottom
FB14  120R@100M-1A  [L0603]  225.88 103.86 270 bottom
FB15  600R@100M-1A  [L0603]  21.97 111.76 90 top
FB16  90@100M  [R0805]  71.75 151 270 top
FB17  90@100M  [R0805]  231.27 51.94 90 top
FB19  90@100M  [R0805]  160.27 20.07 90 top
FB21  90@100M  [R0805]  163.96 20.07 90 top
FBM1  600R@100M-1A  [L0603]  28.47 126.21 270 top
H2  NC-HOLE  [MTH635D320]  228.02 168.26 90 top
H3  NC-HOLE  [MTH635D320]  204.02 146.42 270 top
H4  NC-HOLE  [MTH635D320]  173.37 3.36 0 top
H6  NC-HOLE  [MTH635D320]  229.25 3.36 270 top
H7  NC-HOLE  [MTH635D320]  159.7 168.13 180 top
H8  NC-HOLE  [MTH635D320]  137.78 19.14 270 top
H9  NC-HOLE  [MTH635D320]  135.7 146.29 180 top
H12  NC-HOLE  [MTH635D320]  243.2 140.31 0 top
H13  NC-HOLE  [MTH635D320]  3 3 0 top
H14  NC-HOLE  [MTH635D320]  193.66 19.14 0 top
H18  NC-HOLE  [MTH635D320]  3 140.31 0 top
H19  NC-HOLE  [MTH635D320]  243.2 3 0 top
H20  NC-HOLE  [MTH635D320]  164.9 116.79 0 top
H21  NC-HOLE  [MTH635D320]  164.9 56.06 0 top
H23  NC-HOLE  [MTH635D320]  69.22 56.06 0 top
H25  NC-HOLE  [MTH635D320]  69.22 116.79 0 top
J1  DCIN  [PWR_JACK]  19.56 1.27 0 top
J3  SIM-SLOT  [SDC10B1630_1640H220]  186.46 114.3 180 bottom
J8  NC/OWA-OPTICAL  [SPDIF5B965_1360H960]  242.9 53.94 0 top
J10  NC/CON2X6-2.54-M  [HDR2_6P254B500_1524H254]  3.81 116.2 0 top
J18  MINIPCIE  [PCI54P80B760_3000H400]  195.71 112.54 180 top
J19  CON2X8-2.54-M  [HDR2_8P254B870_2794H900]  19.94 155.02 90 top
J24  ZX-XH2.54-5PWZ  [SKT5P250B700_1500H570_R_THR]  4.95 94.87 270 top
J25  CON5  [HDR1_5P250B570_1500H700]  50.07 13.25 270 top
J28  CON5  [HDR1_5P250B570_1500H700]  46.23 55.73 180 top
J47  CHQ0038D  [TO3B400_400H230_DIP]  243.61 81.28 90 top
J48  NC/CON1X2-2.54-M  [HDR1_2P254B250_508H254]  131.32 124.84 180 top
J57  NC/DC3-2.0MM-14P  [HDR2_7P200B550_2130H560]  114.76 134.59 90 top
J58  2EG01817-D2W-DF  [PCIE_36P100B730_2500H1110_SMD]  194.06 50.21 0 top
J64  CON1X2-2.54-F-DIP  [SKT1_2P254B250_528H850]  223.8 46.88 0 top
J65  NC/DC3-2.0MM-14P  [HDR2_7P200B550_2130H560]  71.63 45.85 90 top
J66  NC/CON1X2-2.54-M  [HDR1_2P254B250_508H254]  2.52 130.01 270 top
J68  SH1.0-10P  [HDR1_10P100B390_1235H509_SMD_V]  69.47 170.03 180 top
J69  SH1.0-10P  [HDR1_10P100B390_1235H509_SMD_V]  105.61 40.89 270 top
J70  LB232-180S-B3R-01-1  [SEDF2_90P50B724_6138H325]  128.8 116.71 180 top
J71  LB232-180S-B3R-01-1  [SEDF2_90P50B724_6138H325]  128.8 57.23 0 top
J72  CON1X2-2.54-F-DIP  [SKT1_2P254B250_528H850]  100.89 16.46 0 top
J73  SH1.0-5P  [HDR1_5P100B390_735H509_SMD_V]  57.66 21.08 0 top
JA1  CON1X2-2.54-F-DIP  [SKT1_2P254B250_528H850]  57.78 170.81 180 top
JA9  PJ-327F  [HP5B650_1400H500]  109.27 166.29 0 top
JC3  DF40HC(3.0)-90DS-0.4V(58)  [SEDSKT90P40B294_2060H290]  211.46 11.25 180 top
JC7  NC/XH2.54MM-2P-M  [HDR1_2P250B570_750H700]  47.75 119.66 0 top
JC9  DF40HC(3.0)-90DS-0.4V(58)  [SEDSKT90P40B294_2060H290]  155.57 11.25 180 top
JE1  HFJ11-1G01E  [RJ12P127B1588_2159H1364]  91.19 168.38 180 top
JH1  HDMI-Type-A-SLOT  [HDMI23P50B1215_1500H838]  116.97 5.08 180 top
JL1  DF17(3.0)-80DS-0.5V  [SKT2_40P50B570_2500H350]  147.7 157.21 180 top
JL2  LVDS0_CN_40PIN  [FPC42P50B450_2410H150]  155.06 138.76 180 top
JL3  CTP_CN  [FPC8P100B515_1090H340_B]  138.81 169.53 180 top
JL4  DF17(3.0)-80DS-0.5V  [SKT2_40P50B570_2500H350]  216.02 157.34 180 top
JL5  LVDS0_CN_40PIN  [FPC42P50B450_2410H150]  223.65 138.89 180 top
JL6  CTP_CN  [FPC8P100B515_1090H340_B]  208.15 169.66 180 top
JL7  FPC-40P-0.5MM-B  [FPC42P50B450_2410H150]  91.82 4.32 0 top
JP11  5P_1.25MM  [CON-R5S-P1_3-H1_5-R]  6.79 79.02 180 top
JP12  NC/J_BAT_TS  [BAT_SMD-3]  2.29 79.02 90 top
JU2  Type-C  [USB30P50B790_894H316_A]  71.5 4.02 180 bottom
JU3  USB-A-02F  [USB8P200B512_1925H1250]  242.39 42.28 90 top
JU4  USB-A-02F  [USB8P200B512_1925H1250]  242.52 29.7 90 top
JU5  USB3-AF3.0-B_4  [USB11P100B850_1500H1590_V_SMD]  192.29 71.45 90 top
JW6  ANT-IPX  [ANT3B300_310H125]  194.69 170.97 180 top
JW7  ANT-IPX  [ANT3B300_310H125]  169.04 170.97 180 top
K1  VOL+  [KEY2B350_600H350]  140.94 34.67 90 top
K2  ENTER  [KEY2B350_600H350]  157.99 34.67 90 top
K3  HOME  [KEY2B350_600H350]  163.67 34.67 90 top
K7  VOL-  [KEY2B350_600H350]  146.62 34.67 90 top
K8  MENU  [KEY2B350_600H350]  152.3 34.67 90 top
K9  FUN1  [KEY2B350_600H350]  135.25 34.67 90 top
K10  FUN1  [KEY2B350_600H350]  129.57 34.67 90 top
L1  220uH@10A-TCH6826A-56UH-B/XR6826TS221MHL7  [RD2B1150_2400H2400]  28.7 28.96 90 top
L2  HPPC06030B-6R8M-AU  [LP680_730H280]  31.24 42.93 0 top
L5  HPPC06030B-6R8M-AU  [LP680_730H280]  31.5 57.4 0 top
L6  HEI252012A-2R2M-PAU-2A  [LP200_250H100]  178.16 21.84 0 top
L10  NC/ICMF112P900MFR  [LC4P55B100_125H50]  194.49 71.42 90 bottom
L11  NC/ICMF112P900MFR  [LC4P55B100_125H50]  228.35 41.08 90 top
L12  NC/ICMF112P900MFR  [LC4P55B100_125H50]  228.14 28.52 90 top
L14  HPPC06030B-6R8M-AU  [LP680_730H280]  229.18 71.07 90 top
L15  BLM18AG601SH1  [L0603]  218.01 102.97 180 bottom
L16  BLM15AG601SH1  [L0402]  221.56 96.88 270 top
L17  56nH  [L0603]  225.37 98.45 270 bottom
L18  180nH  [L0603]  231.09 99.16 180 bottom
L19  56nH  [L0603]  224.48 91.49 270 bottom
L20  180nH  [L0603]  230.2 90.78 180 bottom
L21  BLM15AG102SH1  [L0402]  227.66 89.26 0 bottom
L22  BLM18AG601SH1  [L0603]  220.29 85.32 90 bottom
L23  BLM15AG601SH1  [L0402]  218.26 85.83 270 bottom
L24  HEI252012A-2R2M-PAU-2A  [LP200_250H100]  63.83 78 90 top
LE1  2.2uH-1A  [LP160_200H100]  93.83 146.58 0 bottom
LED2  APSYS-5V  [LED0805]  36.96 48.82 180 top
LED3  3V3-STBY  [LED0805]  15.88 42.93 0 top
LED4  VCC-5V  [LED0805]  36.96 51.69 180 top
LED5  DCIN-12V  [LED0805]  15.88 39.8 0 top
LED8  LET  [LED0805]  188.34 122.68 90 top
LED9  GLED  [LED0603]  89.79 42.27 0 top
LED10  GLED  [LED0603]  85.92 42.27 0 top
LED11  GLED  [LED0603]  93.67 42.27 0 top
LED12  GLED  [LED0603]  97.54 42.27 0 top
LG1  56nH  [L0603]  234.55 108.7 0 top
LL1  10uH-DCR<0.1R-2A  [LP200_250H100]  145.54 143.51 270 bottom
LP10  4.7uH/4A  [LP300_300H100]  80.77 79.5 0 top
LP11  4.7uH/2A  [LP200_250H100]  33.15 69.09 0 top
LP12  1uH-3A/1uH-5A  [LP200_250H100]  26.8 72.77 270 top
LP25  2.2uH/5A  [LP520_540H300]  33.91 99.31 180 top
LP26  6.8uH/4.4A  [LP660_700H480]  57.53 82.17 270 top
LU3  NC/CMF1210UD900MFR  [LC4B65_85H40]  76.45 13.61 180 bottom
LU4  NC/CMF1210UD900MFR  [LC4B65_85H40]  68.66 13.59 180 bottom
LU5  NC/CMF1210UD900MFR  [LC4B65_85H40]  74.93 13.61 180 bottom
LU6  NC/CMF1210UD900MFR  [LC4P55B100_125H50]  71.32 13.28 0 bottom
LU7  NC/CMF1210UD900MFR  [LC4B65_85H40]  67.16 13.59 180 bottom
LW2  NC/2.2uH  [LP200_250H100]  177.85 147.07 0 bottom
MIC1  Micphone  [MIC_600X270]  127.2 167.94 180 top
MIC2  Micphone  [MIC_600X270]  120.85 167.94 180 top
NOREF  -  []  1.52 0 90 top
NOREF#2  -  []  -20.19 -73.79 0 top
NOREF#3  -  []  186.49 89.36 0 top
NOREF#4  -  [unnamed#2]  10.29 141.1 180 top
NOREF#5  -  [unnamed#2]  239.78 167.51 180 top
NOREF#6  -  []  0 1.52 0 top
NOREF#7  -  [unnamed#2]  239.78 6.6 0 top
NOREF#8  -  [unnamed#2]  6.22 7.24 0 top
NOREF#9  -  [unnamed#2]  239.78 6.6 180 bottom
NOREF#10  -  [unnamed#2]  239.78 167.51 270 bottom
NOREF#11  -  [unnamed#2]  6.22 7.24 180 bottom
NOREF#12  -  [unnamed#2]  10.29 141.1 0 bottom
Q1  2N7002  [SOT3P95B130_290H103]  12.42 98.07 90 top
Q2  2N7002  [SOT3P95B130_290H103]  12.42 93.65 90 top
Q3  2N7002  [SOT3P95B130_290H103]  55.25 60.71 180 top
Q4  2N7002  [SOT3P95B130_290H103]  44.81 21.36 270 top
Q5  2N7002  [SOT3P95B130_290H103]  55.25 57.15 180 top
Q6  2N7002  [SOT3P95B130_290H103]  48.31 21.36 270 top
Q7  MMBT3904  [SOT3P95B130_290H103]  90.01 45.19 270 top
Q9  2N7002  [SOT3P95B130_290H103]  16.25 115.19 0 bottom
Q10  MMBT3904  [SOT3P95B130_290H103]  18.92 137.16 180 top
Q12  AO3401  [SOT3P95B130_290H103]  75.18 142.62 90 bottom
Q14  MMBT3904  [SOT3P95B130_290H103]  79.12 139.57 180 bottom
Q15  NC-MMBT3906  [SOT3P95B130_290H103]  12.7 112.14 90 bottom
Q16  MMBT3904  [SOT3P95B130_290H103]  15.75 128.78 90 top
Q17  MMBT3904  [SOT3P95B130_290H103]  16 121.67 0 top
Q18  NC-MMBT3904  [SOT3P95B130_290H103]  12.7 116.46 0 bottom
Q19  NC-MMBT3904  [SOT3P95B130_290H103]  9.14 106.05 0 top
Q20  NC-MMBT3904  [SOT3P95B130_290H103]  16.26 108.58 0 top
Q21  SG30P5 / AO4419  [SOP8P127B395_490H175]  14.48 140.34 90 top
Q22  NC/MMBT3904  [SOT3P95B130_290H103]  31.75 143.51 180 top
Q23  2N7002  [SOT3P95B130_290H103]  16.26 119 90 bottom
Q24  MMBT3904  [SOT3P95B130_290H103]  86.11 45.19 270 top
Q25  2N7002  [SOT3P95B130_290H103]  75.31 152.55 180 bottom
Q26  2N7002  [SOT3P95B130_290H103]  75.31 148.87 180 bottom
Q27  2N7002  [SOT3P95B130_290H103]  215.93 106.17 270 bottom
Q28  2N7002  [SOT3P95B130_290H103]  212.5 106.17 270 bottom
Q29  2N7002  [SOT3P95B130_290H103]  199.77 99.19 180 bottom
Q30  2N7002  [SOT3P95B130_290H103]  199.77 95.78 180 bottom
Q31  2N7002  [SOT3P95B130_290H103]  224.01 125.89 180 top
Q32  2N7002  [SOT3P95B130_290H103]  227.42 125.89 270 top
Q39  MMBT3904  [SOT3P95B130_290H103]  93.92 45.19 270 top
Q40  MMBT3904  [SOT3P95B130_290H103]  97.83 45.19 270 top
Q41  NC/2N7002  [SOT3P95B130_290H103]  71.37 69.85 0 top
Q42  NC/2N7002  [SOT3P95B130_290H103]  71.37 66.42 0 top
Q45  2N7002  [SOT3P95B130_290H103]  190.88 139.32 180 top
Q46  2N7002  [SOT3P95B130_290H103]  182.13 138.99 0 bottom
Q47  MMBT3904  [SOT3P95B130_290H103]  53.19 136.14 90 bottom
Q48  NC/TDM3478/RU3030M3  [DFN5P65B300_450H85-T]  49.78 99.82 180 top
Q49  TDM3478/RU3030M3  [DFN5P65B300_450H85-T]  40.13 97.66 0 top
Q50  TDM3478/RU3030M3  [DFN5P65B300_450H85-T]  27.69 101.22 180 top
Q51  TDM3478/RU3030M3  [DFN5P65B300_450H85-T]  40.13 101.22 180 top
Q52  TDM3478/RU3030M3  [DFN5P65B300_450H85-T]  27.69 97.66 0 top
Q53  CSD25402Q3A  [DFN5P65B300_450H85-T]  21.97 98.42 270 top
Q54  2N7002  [SOT3P95B130_290H103]  74.73 20.07 90 top
Q55  2N7002  [SOT3P95B130_290H103]  70.82 20.07 90 top
Q56  NC/2N7002  [SOT3P95B130_290H103]  140.74 126.7 0 top
QH4  AO3401  [SOT3P95B130_290H103]  111.1 25.02 270 bottom
QH5  MMBT3904  [SOT3P95B130_290H103]  107.57 25.02 90 bottom
QL1  AO3401  [SOT3P95B130_290H103]  130.68 133.47 90 bottom
QL2  MMBT3904  [SOT3P95B130_290H103]  136.27 133.61 270 bottom
QL3  AO3401  [SOT3P95B130_290H103]  202.38 137.79 0 bottom
QL4  MMBT3904  [SOT3P95B130_290H103]  201.22 133.48 90 bottom
QM1  2N7002  [SOT3P95B130_290H103]  36.83 108.2 90 top
QM4  2N7002  [SOT3P95B130_290H103]  32.89 108.2 180 top
QM7  MMBT3904  [SOT3P95B130_290H103]  22.23 120.9 180 top
QM9  MMBT3904  [SOT3P95B130_290H103]  22.22 124.46 0 top
QW1  MMBT3904  [SOT3P95B130_290H103]  198.37 122.68 270 top
QW2  MMBT3904  [SOT3P95B130_290H103]  196.85 102.62 180 bottom
QW3  MMBT3904  [SOT3P95B130_290H103]  206.76 123.44 180 top
R38  NC/100K  [R0402]  92.2 12.95 0 top
R41  NC/100K  [R0402]  90.3 12.95 0 top
R42  10K  [R0402]  94.11 12.95 180 top
R53  1K  [R0402]  89.75 40.61 0 top
R56  1K  [R0402]  90.55 48.51 0 top
R57  100K  [R0402]  90.55 47.5 0 top
R69  NC/4K7  [R0402]  77.47 148.87 90 bottom
R70  NC/4K7  [R0402]  77.47 152.5 90 bottom
R71  4K7  [R0402]  72.64 148.84 180 bottom
R72  4K7  [R0402]  72.64 152.53 180 bottom
R73  0R  [R0402]  69.09 149.58 0 top
R74  0R  [R0402]  69.09 150.47 0 top
R79  100K  [R0402]  74.55 139.57 180 bottom
R80  100R  [R0402]  76.45 139.6 180 bottom
R81  10K  [R0402]  82.17 141.1 270 bottom
R82  NC-10K  [R0402]  14.35 107.19 0 bottom
R83  NC-4K7  [R0603]  14.91 105.88 180 top
R84  10K  [R0603]  15.88 126.36 0 top
R85  47K  [R0402]  8.64 131.57 90 top
R86  NC-10K  [R0402]  10.54 112.39 270 bottom
R87  NC/10K  [R0402]  111.53 130.33 180 top
R89  NC/10K  [R0402]  113.11 129.29 90 top
R92  NC/1K  [R0402]  14.73 97.54 90 top
R93  NC/10K  [R0402]  119.2 129.29 270 top
R94  10K  [R0402]  12.06 100.84 90 top
R96  NC  [R0402]  12.45 90.17 180 top
R98  10K  [R0402]  12.45 91.31 0 top
R102  NC/10K  [R0402]  76.39 41.02 0 top
R103  NC/10K  [R0402]  74.08 41.02 0 top
R104  0R  [R0402]  47.99 112.57 90 top
R105  0R  [R0402]  47.1 112.57 90 top
R106  NC-10K  [R0402]  14.1 113.28 90 top
R107  NC/10K  [R0402]  71.78 41.02 0 top
R112  NC/10K  [R0402]  69.47 41.02 0 top
R119  NC/1K  [R0402]  52.98 61.21 270 top
R120  10K  [R0402]  51.97 60.33 270 top
R122  10K  [R0402]  44.68 18.82 180 top
R124  NC  [R0402]  51.05 55.32 90 top
R127  10K  [R0402]  46.51 23.55 0 top
R130  10K  [R0402]  57.62 56.63 90 top
R158  0R  [R0402]  28.51 118.14 180 bottom
R191  NC-470K-1%  [R0603]  19.43 116.2 180 top
R192  NC-0R  [R0603]  19.43 114.94 0 top
R193  0R  [R0402]  26.29 115.82 270 bottom
R194  NC-68K-1%  [R0603]  16.38 114.94 180 top
R196  NC-12K-1%  [R0603]  16.38 116.2 0 top
R197  0R  [R0402]  133.22 127.64 180 top
R199  100K  [R0402]  81.28 141.1 270 bottom
R258  NC/1K  [R0402]  44.96 25.07 90 top
R259  1K  [R0402]  15.14 95.86 0 top
R260  1K  [R0402]  15.11 94.74 0 top
R261  1K  [R0402]  58.04 59.44 0 top
R262  1K  [R0402]  58.04 58.42 0 top
R449  NC/0R  [R0402]  91.77 53.05 0 bottom
R450  NC/0R  [R0402]  93.62 53.06 180 bottom
R451  10K  [R0402]  93.59 42.27 180 bottom
R452  120R  [R0402]  92.63 43.15 180 bottom
R453  10K  [R0402]  91.69 42.27 180 bottom
R455  NC/0R  [R0402]  61.5 29.38 270 top
R456  NC/0R  [R0402]  58.41 39.92 90 top
R457  NC/0R  [R0402]  60.61 29.38 270 top
R458  NC/0R  [R0402]  57.43 39.92 90 top
R459  0R  [R0402]  59.72 29.38 270 top
R460  0R  [R0402]  58.83 29.38 270 top
R461  0R  [R0402]  57.94 29.38 270 top
R465  10K  [R0402]  19.94 112.52 90 bottom
R466  10K  [R0402]  18.41 116.33 90 bottom
R469  10K  [R0402]  18.41 118.24 270 bottom
R470  NC-0R  [R0402]  18.41 120.14 270 bottom
R502  10K  [R0402]  240.41 79.38 90 top
R503  33R  [R0402]  240.28 82.45 270 top
R523  1K  [R0402]  49.43 8.06 270 top
R533  NC/10K  [R0402]  115.27 129.29 270 top
R534  NC/10K  [R0402]  116.15 129.29 270 top
R535  NC  [R0402]  50.38 17.91 180 top
R536  NC/1K  [R0402]  44.35 23.55 0 top
R537  NC/1K  [R0402]  45.9 25.07 90 top
R556  0R  [R0402]  194.18 41.27 270 top
R557  0R  [R0402]  181.97 57.3 270 top
R559  0.01R-1%  [R0603]  187.32 59.56 270 top
R596  0R  [R0402]  76.3 14.99 270 top
R597  0R  [R0402]  79.1 14.99 270 top
R784  NC-0R  [R0402]  18.41 114.3 90 bottom
R785  10K  [R0402]  19.43 120.27 90 bottom
R790  0R  [R0603]  62.87 28.07 270 top
R791  0R  [R0603]  59.44 131.06 90 top
R958  0R  [R0402]  57.05 29.38 270 top
R960  10K  [R0402]  61.21 125.48 270 top
R961  120R  [R0402]  60.2 126.36 270 top
